# Altium PCB DAP-PCB-REV-3.2.PcbDoc (part 2 of 5)
Units mm, origin at the board's own origin, x right, y up, seen from the top; angles counter-clockwise.
Board outline 54.75 x 54.75 mm, 6 copper layers (L1 (SIG/PWR), L2 (GND), L3 (SIG), L4 (PWR), L5 (GND), L6 (SIG/PWR)), stack 1.65 mm thick; 308 components, 179 nets, 954 pads, 440 vias.
Unrouted connection lines stored in the file: 7.
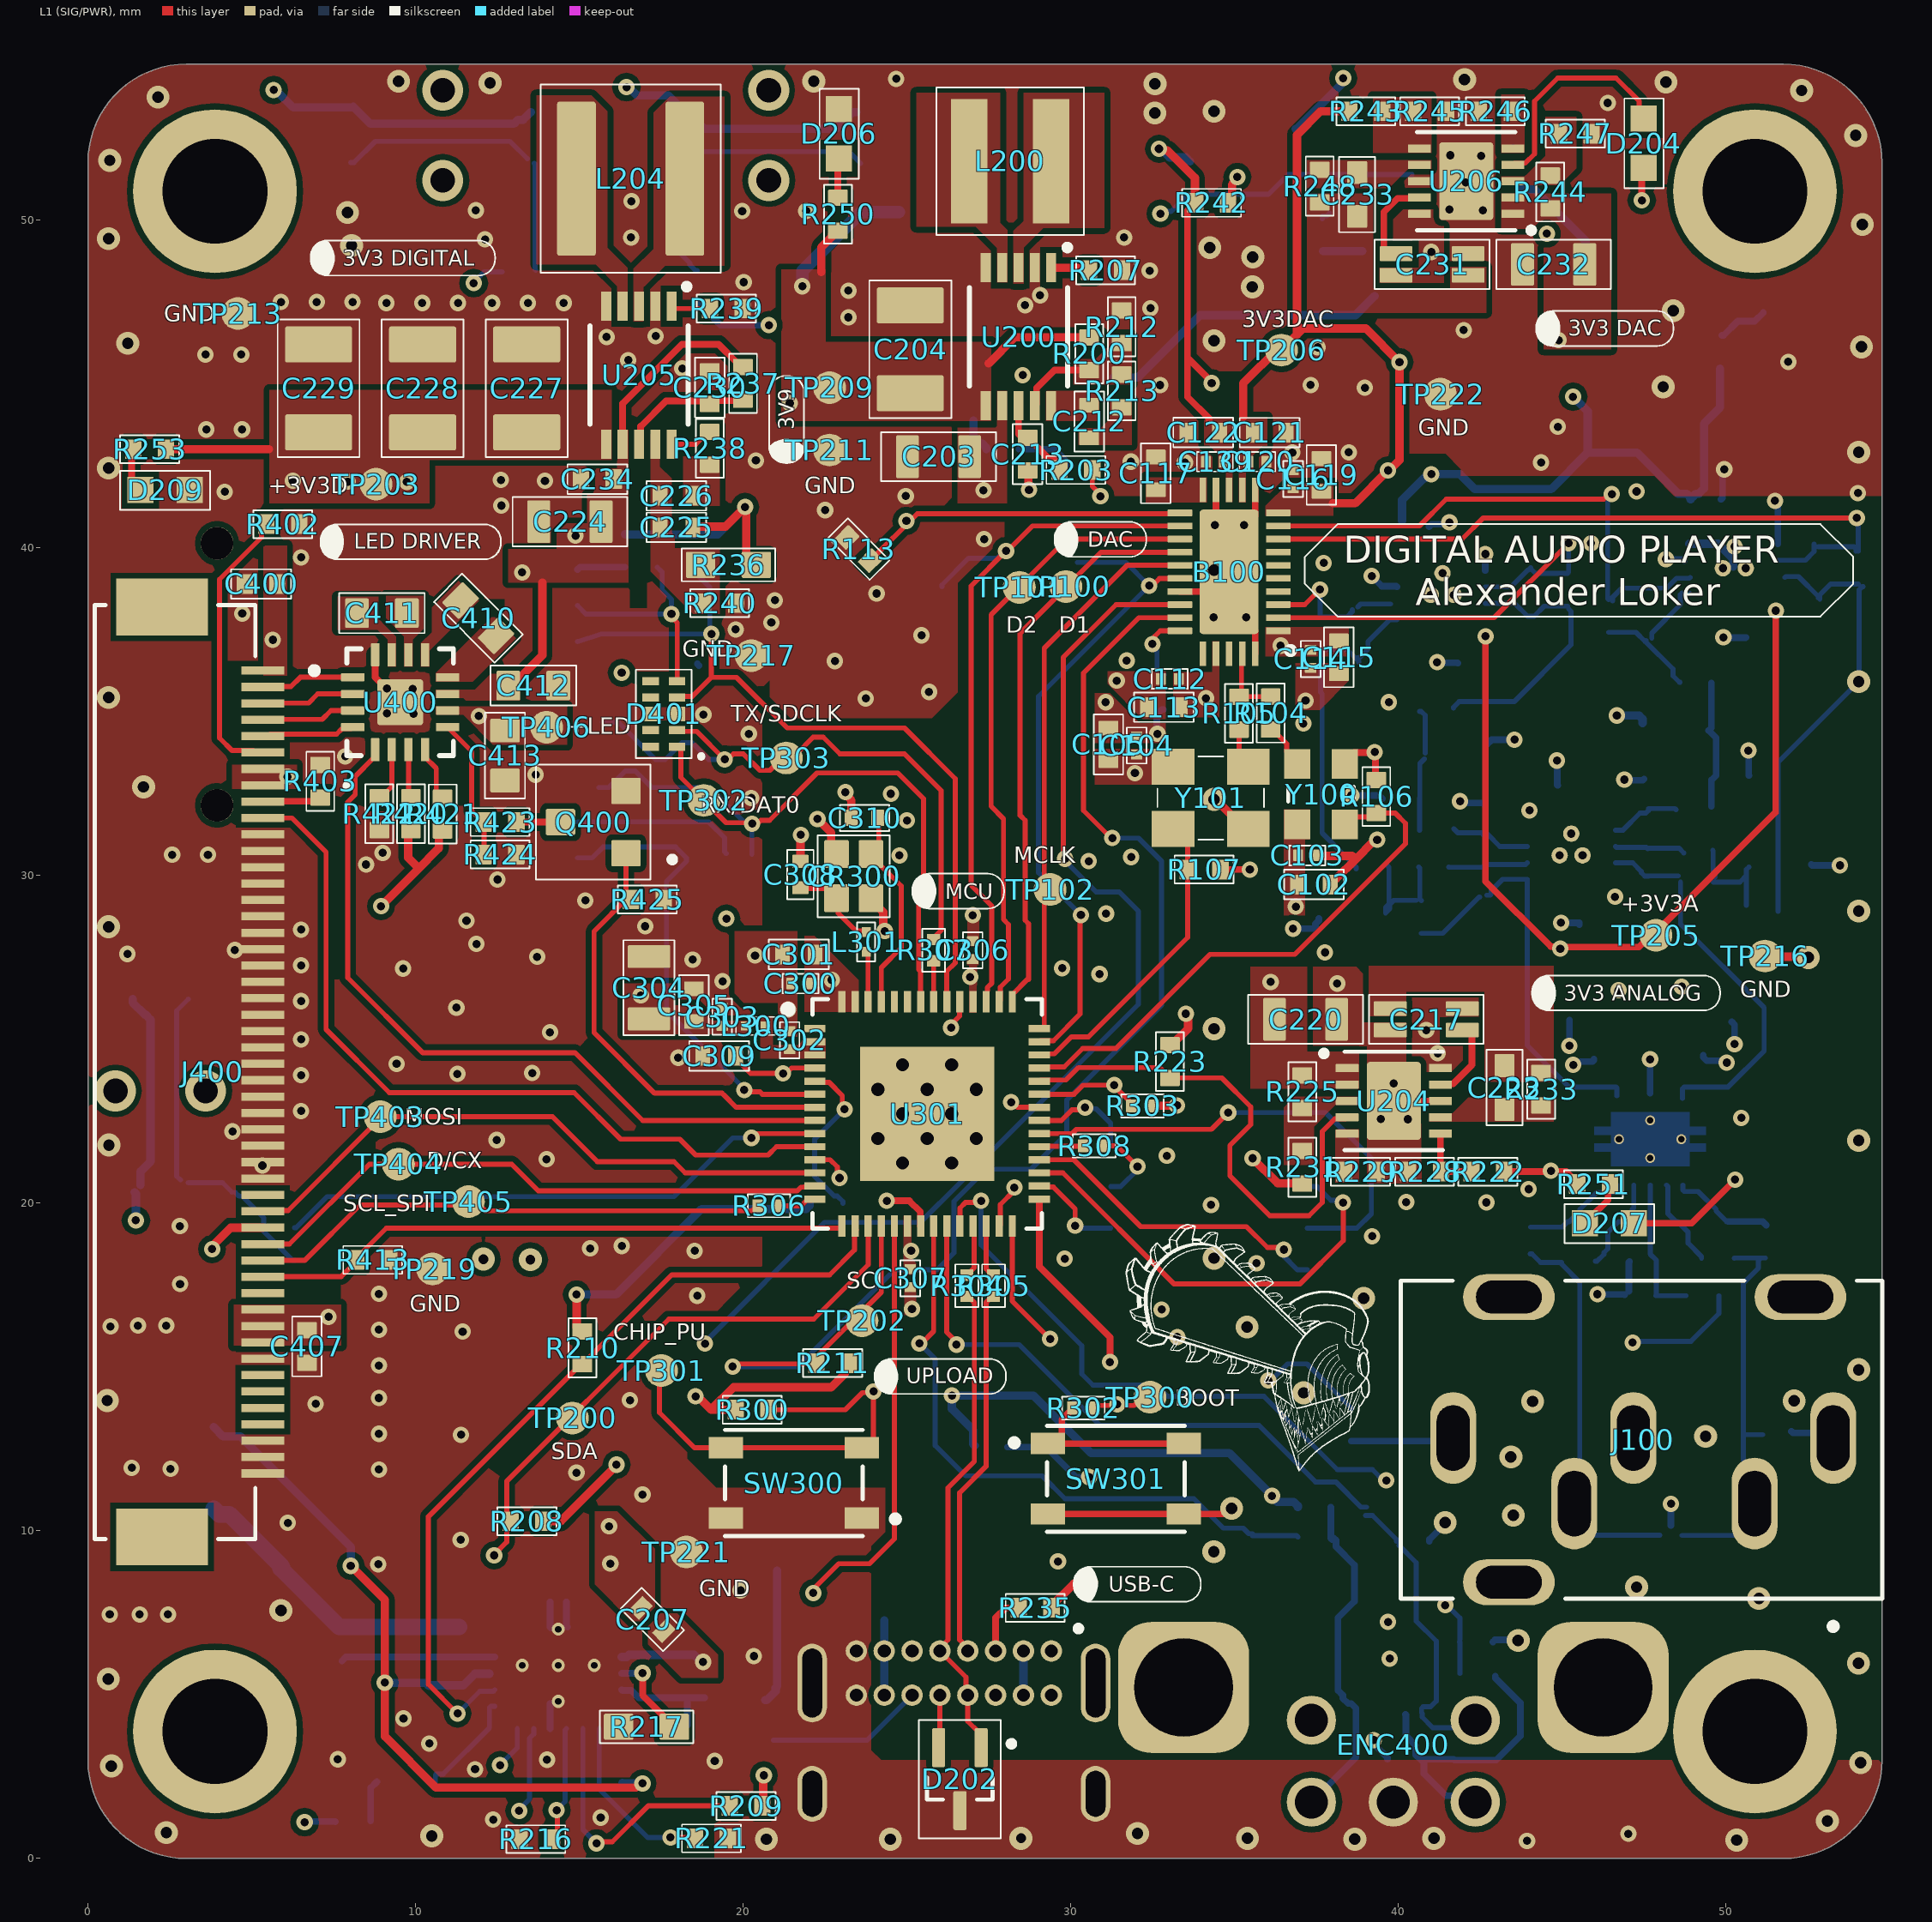
[diagram p0: L1 (SIG/PWR) view]

## Part data (continued)
C210: library part #1-048, <Rating>=50V, <Tolerance>=0.1, <Value>=0.1uF, Manufacturer 1="Murata Electronics", Manufacturer Part Number 1=GRM155R71H104KE14D, Supplier Part Number 1=490-10700-1-ND, <Footprint>=0402, <Spec>=X7R, <Termination>=SMD, AL-PN=#1-048, Creator Project=aRTy, Lead Time="17 Weeks", PartType=Capacitor, Status=Unverified, SubType=Ceramic, Supplier 1=Digikey, Supplier Label="0.1 µF ±10% 50V Ceramic Capacitor X7R 0402 (1005 Metric)", Type=Standard
C212 C226: library part #1-077, <Rating>=50V, <Tolerance>=0.02, <Value>=1.5nF, Manufacturer 1="Murata Electronics", Manufacturer Part Number 1=GRM1555C1H152GA01D, Supplier Part Number 1=490-GRM1555C1H152GA01DCT-ND, <Footprint>=0402, <Spec>=C0G, <Termination>=SMD, AL-PN=#1-077, Creator Project=DAP, Footprint Status=Verified, Lead Time="17 Weeks", PartType=Capacitor, Status=Unverified, SubType=Ceramic, Supplier 1=Digikey, Supplier Label="1500 pF ±2% 50V Ceramic Capacitor C0G, NP0 0402 (1005 Metric)", Type=Standard
C214: library part #1-092, <Rating>=35V, <Tolerance>=0.1, <Value>=1uF, Manufacturer 1="Murata Electronics", Manufacturer Part Number 1=GRM155R6YA105KE11D, Supplier Part Number 1=490-10019-1-ND, <Footprint>=0402, <Spec>=X5R, <Termination>=SMD, AL-PN=#1-092, Creator Project=DAP, Footprint Status=Verified, Lead Time="17 Weeks", PartType=Capacitor, Status=Unverified, SubType=Ceramic, Supplier 1=Digikey, Supplier Label="1 µF ±10% 35V Ceramic Capacitor X5R 0402 (1005 Metric)", Type=Standard
C216 C217 C231: library part #1-142, "CAP CER 10UF 10V X7R 0805 - CUT", <Rating>=10V, <Tolerance>=0.1, <Value>=10uF, Manufacturer 1="Murata Electronics", Manufacturer Part Number 1=GCM21BR71A106KE22K, Supplier Part Number 1=490-14531-1-ND, <Footprint>=0805, <Spec>=X7R, <Termination>=SMD, AL-PN=#1-142, Creator Project=DAP, Footprint Status=Verified, Lead Time="21 Weeks", PartType=Capacitor, Status=Unverified, SubType=Ceramic, Supplier 1=Digikey, Supplier Label="10 µF ±10% 10V Ceramic Capacitor X7R 0805 (2012 Metric)", Type=Standard
C219 C221: library part #1-071, <Rating>=16V, <Tolerance>=0.1, <Value>=4.7uF, Manufacturer 1="Murata Electronics", Manufacturer Part Number 1=GRM21BR71C475KE51L, Supplier Part Number 1=490-14466-1-ND, <Footprint>=0805, <Spec>=X7R, <Termination>=SMD, AL-PN=#1-071, Creator Project=DAP, Footprint Status=Verified, Lead Time="17 Weeks", PartType=Capacitor, Status=Unverified, SubType=Ceramic, Supplier 1=Digikey, Supplier Label="4.7 µF ±10% 16V Ceramic Capacitor X7R 0805 (2012 Metric)", Type=Standard
C222 C223 C233: library part #1-098, <Rating>=16V, <Tolerance>=0.2, <Value>=2.2uF, Manufacturer 1="Vishay Sprague", Manufacturer Part Number 1=298D225X0016M2T, Supplier Part Number 1=718-1613-1-ND, <Footprint>=0603, <Termination>=SMD, AL-PN=#1-098, Creator Project=DAP, Footprint Status=Verified, Lead Time="23 Weeks", PartType=Capacitor, Status=Unverified, SubType=Tantalum, Supplier 1=Digikey, Supplier Label="2.2 µF Molded Tantalum Capacitors 16 V 0603 (1608 Metric) 12Ohm", Type=Standard
C225: library part #1-096, <Rating>=50V, <Tolerance>=0.05, <Value>=100pF, Manufacturer 1="Murata Electronics", Manufacturer Part Number 1=GRM1555C1H101JA01D, Supplier Part Number 1=490-5922-1-ND, <Footprint>=0402, <Spec>=C0G, <Termination>=SMD, AL-PN=#1-096, Creator Project=DAP, Footprint Status=Verified, Lead Time="17 Weeks", PartType=Capacitor, Status=Unverified, SubType=Ceramic, Supplier 1=Digikey, Supplier Label="100 pF ±5% 50V Ceramic Capacitor C0G, NP0 0402 (1005 Metric)", Type=Standard
C300: library part #1-145, <Rating>=10V, <Tolerance>=0.1, <Value>=10nF, Manufacturer 1="Murata Electronics", Manufacturer Part Number 1=GRM033R71A103KA01D, Supplier Part Number 1=490-3194-1-ND, <Footprint>=0201, <Spec>=X7R, <Termination>=SMD, AL-PN=#1-145, Creator Project=DAP, Footprint Status=Verified, Lead Time="17 Weeks", PartType=Capacitor, Status=Unverified, SubType=Ceramic, Supplier 1=Digikey, Supplier Label="10000 pF ±10% 10V Ceramic Capacitor X7R 0201 (0603 Metric)", Type=Standard
C308 C310: library part #1-122, <Rating>=50V, <Tolerance>=0.01, <Value>=12pF, Manufacturer 1="Murata Electronics", Manufacturer Part Number 1=GJM1555C1H120FB01D, Supplier Part Number 1=490-11190-1-ND, <Footprint>=0402, <Spec>=C0G, <Termination>=SMD, AL-PN=#1-122, Creator Project=DAP, Footprint Status=Verified, Lead Time="17 Weeks", PartType=Capacitor, Status=Unverified, SubType=Ceramic, Supplier 1=Digikey, Supplier Label="12 pF ±1% 50V Ceramic Capacitor C0G, NP0 0402 (1005 Metric)", Type=Standard
C404 C405: library part #1-040, <Rating>=16V, <Tolerance>=0.1, <Value>=10nF, Manufacturer 1=YAGEO, Manufacturer Part Number 1=CC0402KRX7R7BB103, Supplier Part Number 1=311-1042-2-ND, <Footprint>=0402, <Spec>=X7R, <Termination>=SMD, AL-PN=#1-040, Creator Project=aRTy, Footprint Status=Verified, Lead Time="21 Weeks", PartType=Capacitor, Status=Unverified, SubType=Ceramic, Supplier 1=Digikey, Supplier Label="10000 pF ±10% 16V Ceramic Capacitor X7R 0402 (1005 Metric)", Type=Standard
CR300: library part #1-118, <Rating>=10pF, <Value>="40 MHz", Manufacturer 1="ECS Inc.", Manufacturer Part Number 1=ECS-400-10-37B2-CKY-TR, Supplier Part Number 1=50-ECS-400-10-37B2-CKY-TRCT-ND, <Spec>=40Ohm, <Termination>=SMD, AL-PN=#1-118, Creator Project=DAP, Footprint Status=Verified, Lead Time=N/A, PartType=Crystal, Status=Unverified, Supplier 1=Digikey, Supplier Label="40 MHz ±10ppm Crystal 12pF 40 Ohms 4-SMD, No Lead", Type=Standard
D100: library part #1-112, <Rating>=0.2pF, <Value>=8.4V(Cl), Manufacturer 1="Texas Instruments", Manufacturer Part Number 1=ESD122DMXR, Supplier Part Number 1=296-48543-1-ND, <Termination>=SMD, AL-PN=#1-112, Creator Project=DAP, Footprint Status=Verified, Lead Time="9 Weeks", PartType=Diode, Status=Unverified, SubType=TVS, Supplier 1=Digikey, Supplier Label="8.4V (Typ) Clamp 2.5A (8/20µs) Ipp Tvs Diode Surface Mount 3-X2SON (1x0.6)", Type=Standard
D200 D204 D205 D206 D207 D208 D209: library part #1-009, <Rating>=30mA, <Value>=2.1V, Manufacturer 1="Lite-On Inc", Manufacturer Part Number 1=LTST-C190GKT, Supplier Part Number 1=160-LTST-C190GKTTR-ND, <Spec>=GREEN, <Termination>=SMD, AL-PN=#1-009, Creator Project=Bootcamp, Footprint Status=Verified, Lead Time="14 Weeks", PartType=Diode, Status=Unverified, SubType=LED, Supplier 1=Digikey, Supplier Label="Green 569nm LED Indication - Discrete 2.1V 0603 (1608 Metric)", Type=Standard
D201: library part #1-049, <Rating>=7.78V(Bd), <Value>=12V(Cl), Manufacturer 1="Diodes Incorporated", Manufacturer Part Number 1=SMAJ7.0A-13-F, Supplier Part Number 1=SMAJ7.0A-FDICT-ND, <Spec>=7V(Rv), <Termination>=SMD, AL-PN=#1-049, Creator Project=aRTy, Footprint Status=Verified, Lead Time="12 Weeks", PartType=Diode, Status=Unverified, SubType=TVS, Supplier 1=Digikey, Supplier Label="12V Clamp 33.3A Ipp Tvs Diode Surface Mount SMA", Type=Standard
D202: library part #1-099, <Rating>=1.5pF, <Value>=12.4V(Cl), Manufacturer 1="Texas Instruments", Manufacturer Part Number 1=TPD2E2U06QDCKRQ1, Supplier Part Number 1=296-44302-1-ND, <Spec>=20kV, <Termination>=SMD, AL-PN=#1-099, Creator Project=DAP, Footprint Status=Verified, Lead Time="9 Weeks", PartType=Diode, Status=Unverified, SubType=TVS, Supplier 1=Digikey, Supplier Label="12.4V (Typ) Clamp 5.5A (8/20µs) Ipp Tvs Diode Surface Mount SC-70-3", Type=Standard
D400 D401: library part #1-152, <Rating>=10V(Cl), <Value>=5v(Rf), Manufacturer 1=onsemi, Manufacturer Part Number 1=ESD7004MUTAG, Supplier Part Number 1=ESD7004MUTAGOSCT-ND, <Termination>=SMD, AL-PN=#1-152, Copyright="Copyright (C) 2026 Ultra Librarian. All rights reserved.", Creator Project=DAP, Footprint Status=Verified, Lead Time="99 Weeks", Manufacturer_Name=onsemi, Manufacturer_Part_Number=ESD7004MUTAG, PartType=Diode, RefDes=RefDes, Status=Unverified, SubType=TVS, Supplier 1=Digikey, Supplier Label="10V Clamp 1A (8/20µs) Ipp Tvs Diode Surface Mount 10-UDFN (2.5x1)", Type=Standard
D402 D403 D404: library part #1-141, <Rating>=12.3V(Cl), <Value>=5V(Rf), Manufacturer 1=onsemi, Manufacturer Part Number 1=ESD9X5.0ST5G, Supplier Part Number 1=ESD9X5.0ST5GOSCT-ND, <Termination>=SMD, AL-PN=#1-141, Creator Project=DAP, Footprint Status=Verified, Lead Time="57 Weeks", PartType=Diode, Status=Unverified, SubType=TVS, Supplier 1=Digikey, Supplier Label="12.3V Clamp 8.7A (8/20µs) Ipp Tvs Diode Surface Mount SOD-923", Type=Standard
ENC400: library part #1-135, Manufacturer 1="TT Electronics", Manufacturer Part Number 1=EN12-VS11AF18, Supplier Part Number 1=987-1198-ND, <Termination>=Thru, AL-PN=#1-135, Creator Project=DAP, Footprint Status=Unverified, Lead Time="34 Weeks", Notes="Bad Drawing", PartType=Encoder, Status=Unverified, SubType=Quadrature, Supplier 1=Digikey, Supplier Label="Rotary Encoder Mechanical 12 Quadrature (Incremental) Right Angle", Type=Standard
FB200: library part #1-068, <Rating>=3A, <Value>=120Ohm, Manufacturer 1="Würth Elektronik", Manufacturer Part Number 1=742792023, Supplier Part Number 1=732-1613-1-ND, <Footprint>=0805, <Termination>=SMD, AL-PN=#1-068, Creator Project=DAP, Footprint Status=Verified, Lead Time="33 Weeks", PartType=Misc, Status=Unverified, SubType="Ferrite Bead", Supplier 1=Digikey, Supplier Label="120 Ohms @ 100 MHz 1 Signal Line Ferrite Bead 0805 (2012 Metric) 3A 30mOhm", Type=Standard
J100: library part #1-111, <Value>=3.5mm, Manufacturer 1="Same Sky", Manufacturer Part Number 1=SJ1-3535NS, Package=None, Supplier Part Number 1=CP1-3535NS-ND, <Termination>=Thru, AL-PN=#1-111, Check_prices=https://www.snapeda.com/parts/SJ1-3535NS/Same+Sky/view-part/?ref=eda, Creator Project=DAP, Footprint Status=Verified, Lead Time="19 Weeks", MF="Same Sky", MP=SJ1-3535NS, PartType=Connector, SnapEDA_Link=https://www.snapeda.com/parts/SJ1-3535NS/Same+Sky/view-part/?ref=snap, Status=Unverified, SubType=Audio, Supplier 1=Digikey, Supplier Label="3.50mm (0.141\", 1/8\", Mini Plug) - Headphone Phone Jack Stereo (3 Conductor, TRS) Connector Solder", Type=Standard